# Altium PCB BOARD_4LAYER.PcbDoc (part 15 of 21)
Units mil, origin at the board's own origin, x right, y up, seen from the top; angles counter-clockwise.
Board outline 6692.91 x 10039.37 mil, 4 copper layers (Top Layer, Mid Layer 1, Mid Layer 2, Bottom Layer), stack 66.299 mil thick; 1532 components, 908 nets, 4105 pads, 1286 vias.
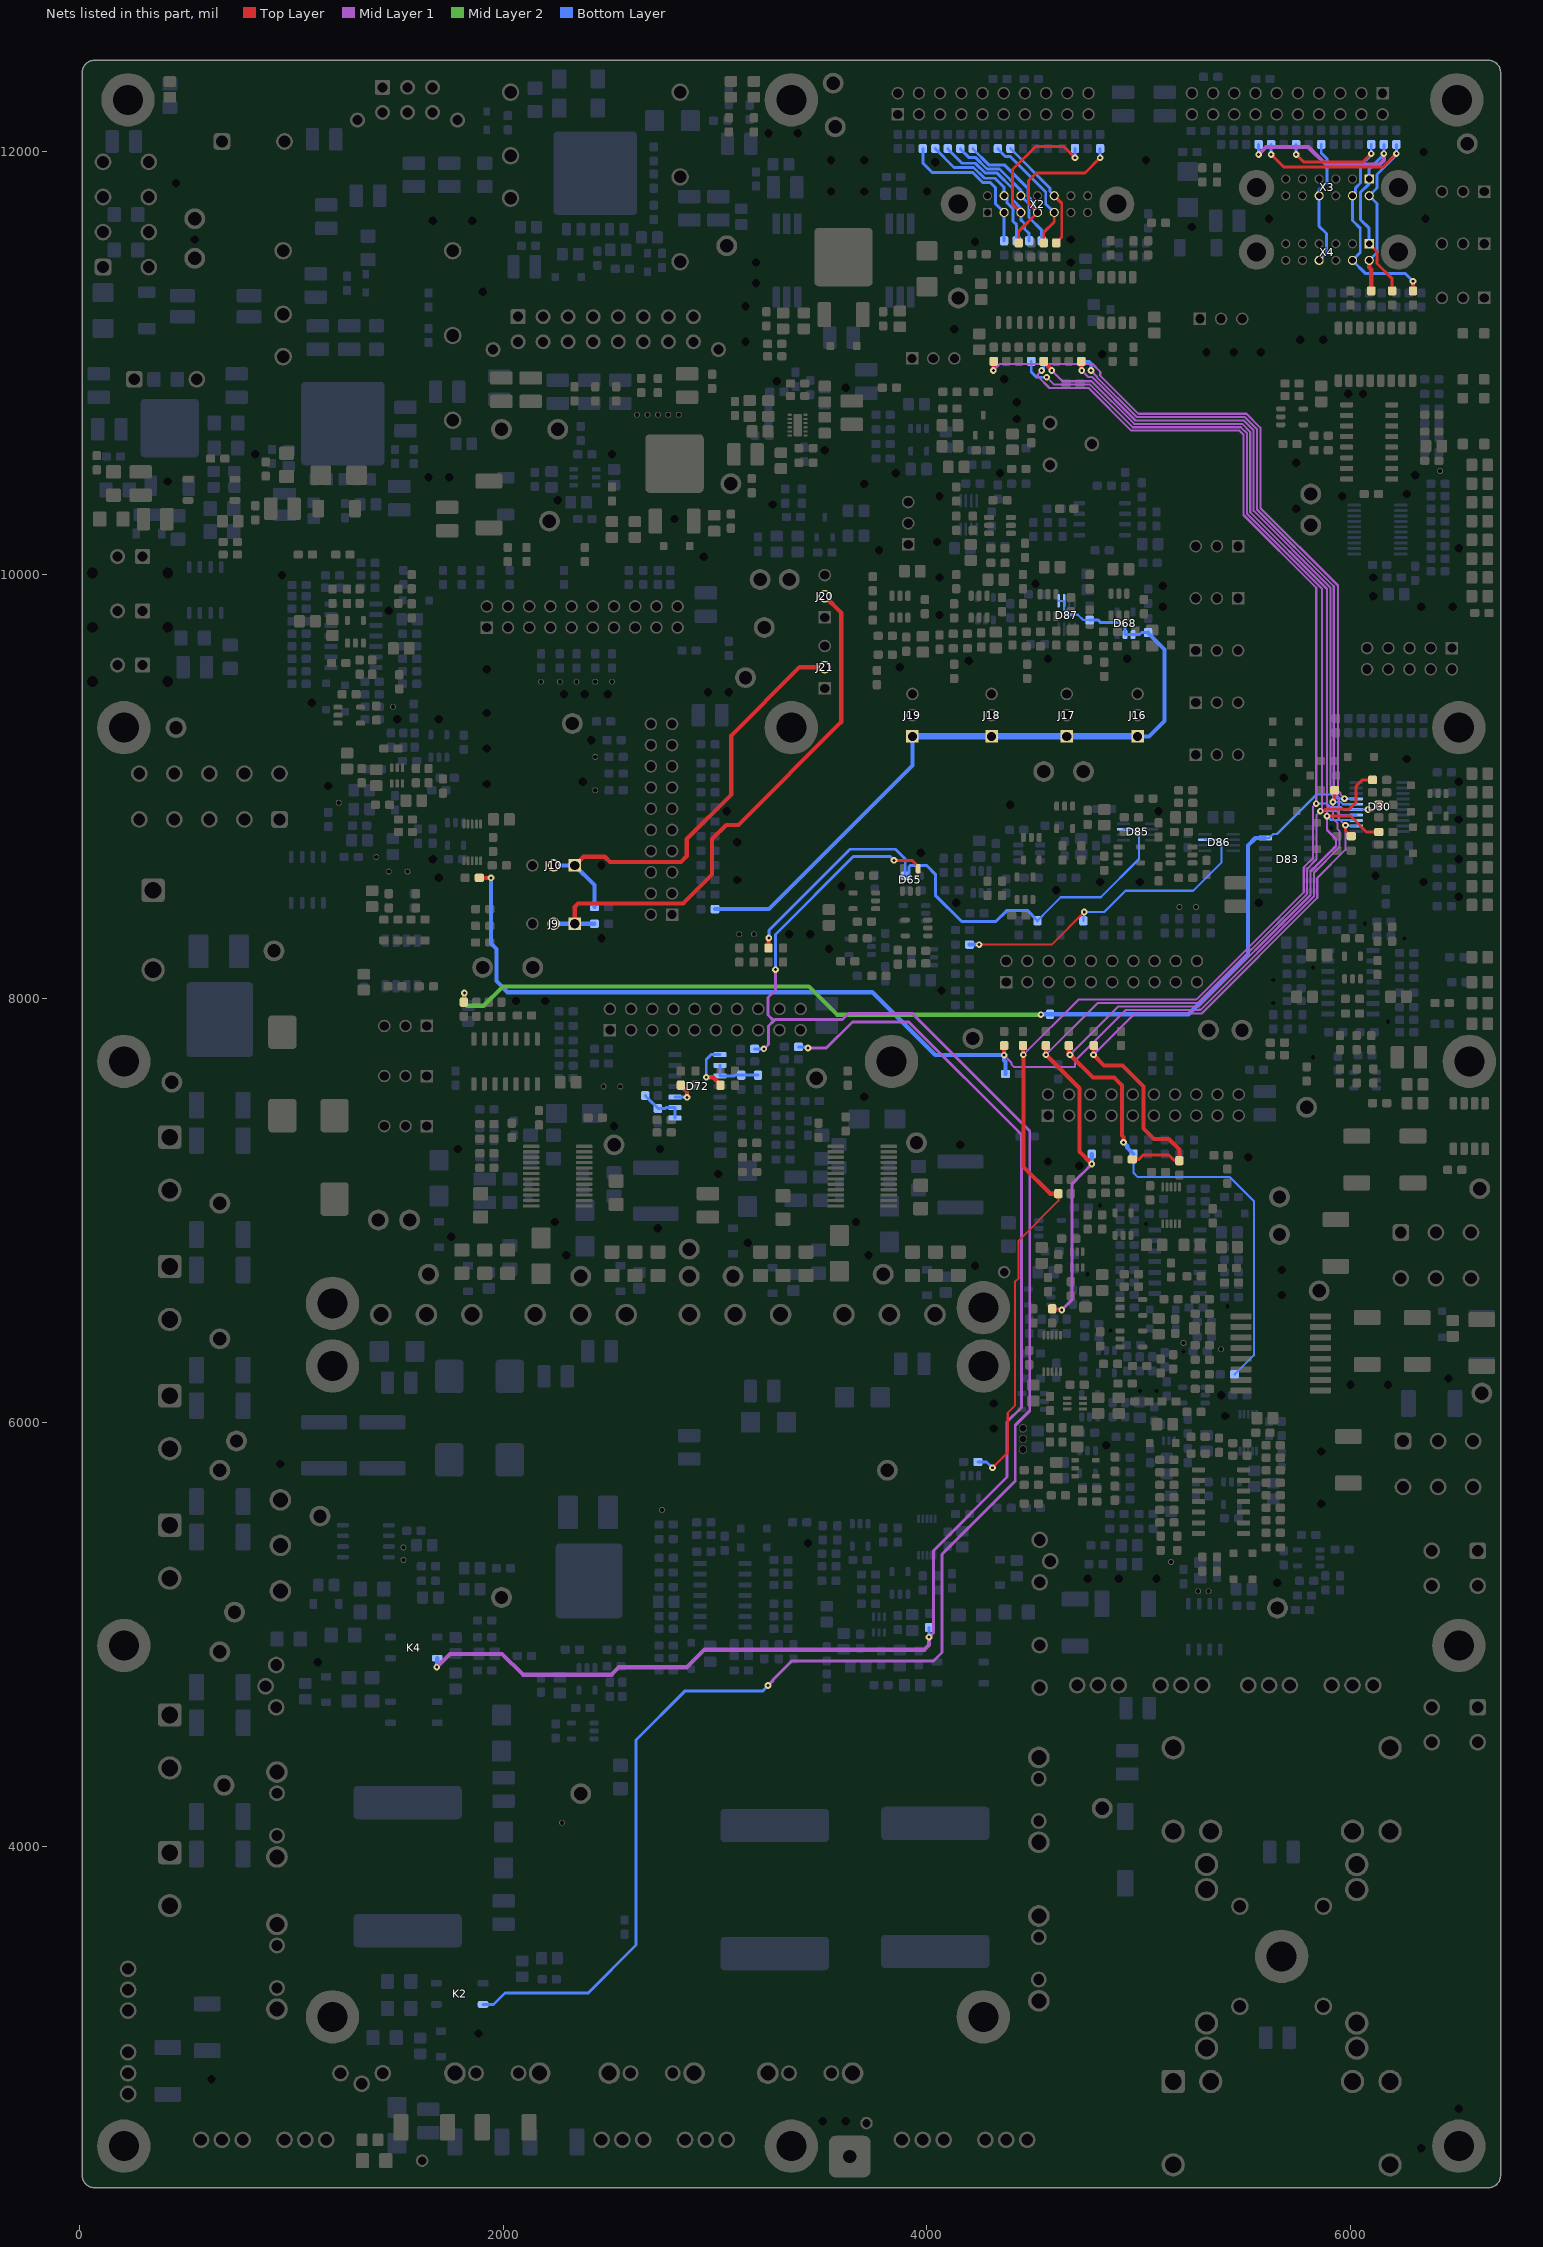
[diagram p17: the nets of this part, all layers, seen from the top]

## Via types
v1: diameter 27.56/31.5/31.5/27.56 (per signal layer), hole 13.78, Top Layer to Bottom Layer, 1270 vias
v2: diameter 59.06, hole 39.37, Top Layer to Bottom Layer, 16 vias

## Nets (pads, with @x,y where several pads share a name; then routed paths per layer and width w, separated by ;. In a path a pad name is that pad's centre, name@x,y a point inside that pad or via, vN(x,y) a via of type N, cw(c..) or ccw(c..) an arc to the next point about the centre after c; other vN are vias at no path point) (continued)
A0_PS: R26.1 R434.1 R611.1 X3.8 X4.8 | length 1417.8
  Top Layer w13.78: v1(5742.13,11984.25) 5776.84,11949.54 6057.81,11949.54 v1(6096.46,11988.19)
  Top Layer w19.68: R611.1@6293.31,11340.55 v1(6293.31,11385.83)
  Bottom Layer w13.78: v1(5742.13,11984.25) R26.1@5742.13,12031.5 ; R434.1@6096.46,12031.5 v1(6096.46,11988.19) 6096.46,11982.37 6045.91,11931.82 6045.91,11849.9 6022.76,11826.75 6022.76,11804.25 X3.8@6007.87,11789.37 6007.87,11672.59 6044.57,11635.9 6044.57,11520.94 X4.8@6007.87,11484.25 6070.54,11421.59 6257.54,11421.59 v1(6293.31,11385.83)
A1_PS: R27.2 R430.1 R612.1 X3.1 X4.1 | length 1524.6
  Top Layer w13.78: X4.1@6086.61,11562.99 6122.95,11526.65 6122.95,11469.78 6194.88,11397.85 R612.1@6194.88,11340.55
  Mid Layer 1 w19.68: v1(5564.96,11984.25) 5600.1,12019.39 5798.92,12019.39 5882.05,11936.26 6135.08,11936.26 6155.51,11956.69 v1(6155.51,11988.19)
  Bottom Layer w13.78: v1(5564.96,11984.25) R27.2@5564.96,12031.5 ; X4.1@6086.61,11562.99 6086.61,11635.76 6046.08,11676.29 6046.08,11805.69 6086.61,11846.22 X3.1@6086.61,11868.11 6086.61,11915.35 6155.51,11984.25 v1(6155.51,11988.19) R430.1@6155.51,12031.5
A2_PS: R28.1 R435.1 R613.1 X3.7 X4.7 | length 1467.2
  Top Layer w13.78: v1(5624.02,11984.25) 5683.36,11924.9 6151.28,11924.9 v1(6214.57,11988.19)
  Top Layer w19.68: X4.7@6086.61,11484.25 6086.61,11451.69 6096.46,11441.85 R613.1@6096.46,11340.55
  Bottom Layer w13.78: v1(5624.02,11984.25) R28.1@5624.02,12031.5 ; X4.7@6086.61,11484.25 6123.5,11521.14 6123.5,11752.48 X3.7@6086.61,11789.37 6122.95,11825.71 6122.95,11889.82 6214.57,11981.44 v1(6214.57,11988.19) R435.1@6214.57,12031.5
BLOCING: D30.7 D83.6 R12.2 R44.2 R500.1 | length 8504.7
  Top Layer w10: R44.2@1814.96,7984.25 1814.96,8025.59 v1(1816.93,8027.56)
  Top Layer w19.68: v1(4312.99,10964.57) 4314.96,10966.54 R12.2@4314.96,11007.87
  Mid Layer 1 w10: v1(4312.99,10964.57) 4343.58,10995.16 4780.73,10995.16 4817.52,10958.36 4817.52,10940.35 4997.32,10760.55 5507.45,10760.55 5573.32,10694.68 5573.32,10315.85 5939.08,9950.09 5939.08,8981.89 5951.63,8969.34 5951.63,8963.73 v1(5970.47,8944.88)
  Mid Layer 2 w19.68: v1(1816.93,8027.56) 1816.93,7981.63 1830.85,7967.71 1908.91,7967.71 1999.52,8058.32 3442.52,8058.32 3575.64,7925.2 v1(4537.4,7925.2)
  Bottom Layer w10: D83.6@5596.46,8759.45 5615.16,8759.45 5633.53,8777.82 5651.41,8777.82 5837.86,8964.27 5917.47,8964.27 5936.7,8945.04 5970.31,8945.04 v1(5970.47,8944.88) 5971.46,8943.9 D30.7@6025.59,8943.9
  Bottom Layer w19.68: v1(4537.4,7925.2) 4539.37,7927.17 R500.1@4580.71,7927.17 5234.26,7927.17 5514.79,8207.7 5514.79,8723.74 5548.92,8757.87 5550.2,8757.87 5551.78,8759.45 D83.6@5596.46,8759.45
BLOCING_AMP: D30.3 R14.2 R63.1 R101.1 R482.1 R494.1 | length 7654.6
  Top Layer w13.78: v1(5887.8,8862.2) 5998.13,8862.2 6072.93,8787.4 R101.1@6131.89,8787.4
  Top Layer w19.68: R14.2@4551.18,11007.87 4551.18,11005.91 4588.58,10968.5 v1(4588.58,10964.57) ; R494.1@4669.29,7779.53 4669.29,7742.13 v1(4675.2,7736.22) 4782.89,7628.53 4883.31,7628.53 4919.91,7591.93 4919.91,7354.78 4927.17,7347.52 v1(4927.17,7322.83)
  Mid Layer 1 w10: v1(4588.58,10964.57) 4639.24,10913.91 4776.48,10913.91 4977.56,10712.83 5487.68,10712.83 5525.6,10674.91 5525.6,10296.09 5887.8,9933.89 5887.8,8914.52 5891.05,8911.26 5891.05,8898.09 5887.8,8894.83 v1(5887.8,8862.2) 5887.8,8796.52 5930.2,8754.12 5930.2,8721.24 5809.65,8600.69 5809.65,8489.71 5284.38,7964.44 4903.41,7964.44 v1(4675.2,7736.22)
  Bottom Layer w10: R482.1@4974.41,7267.72 4974.41,7179.63 4995.14,7158.9 5429.77,7158.9 5542.4,7046.27 5542.4,6317.99 5452.76,6228.35 R63.1@5450.79,6228.35 ; v1(5887.8,8862.2) 5906.42,8843.58 6023.54,8843.58 D30.3@6025.59,8841.54
  Bottom Layer w19.68: v1(4927.17,7322.83) 4945.09,7304.91 4945.09,7299 4945.9,7298.2 4945.9,7296.23 R482.1@4974.41,7267.72
BLOCING_AMP_UM: R20.1 R444.1 X2.5 | length 588.9
  Top Layer w13.78: R20.1@4551.18,11566.93 4551.18,11616.69 4600.39,11665.9 X2.5@4600.39,11710.63
  Bottom Layer w13.78: R444.1@4334.65,12011.81 4334.65,12009.84 4369.74,11974.75 4392.96,11974.75 4560.31,11807.4 4560.31,11750.72 X2.5@4600.39,11710.63
BLOCING_IP: D30.6 R15.2 R56.1 R102.1 R478.1 R505.1 | length 8631.2
  Top Layer w13.78: v1(5915.35,8929.13) 5923.23,8937.01 R102.1@5923.23,8984.25
  Top Layer w19.68: R56.1@1887.8,8570.87 v1(1942.91,8570.87) ; v1(4364.17,7734.25) R505.1@4364.17,7779.53 ; R15.2@4728.35,11007.87 4728.35,10966.54 v1(4730.31,10964.57)
  Mid Layer 1 w10: v1(4364.17,7734.25) 4398.46,7699.97 4398.46,7692.09 4412.6,7677.94 4698.58,7677.94 4698.58,7707.76 4937.83,7947.01 5282.74,7947.01 5284.26,7948.53 5290.96,7948.53 5825.55,8483.12 5825.55,8594.1 5946.1,8714.65 5946.1,8792.44 5937.93,8800.61 5937.93,8827.82 5915.35,8850.39 v1(5915.35,8929.13) 5915.35,8960.63 5903.7,8972.28 5903.7,9940.48 5541.5,10302.68 5541.5,10681.5 5494.27,10728.73 4984.15,10728.73 4779.02,10933.86 4761.02,10933.86 v1(4730.31,10964.57)
  Bottom Layer w10: v1(5915.35,8929.13) 5951.31,8929.13 5962.14,8918.31 D30.6@6025.59,8918.31
  Bottom Layer w19.68: v1(1942.91,8570.87) 1942.91,8261.42 1968.71,8235.63 1968.71,8083.93 2021.51,8031.13 3742.08,8031.13 4038.96,7734.25 v1(4364.17,7734.25) 4364.17,7709.57 4370.08,7703.66 R478.1@4370.08,7645.67
BLOCING_IP_UM: R21.1 R440.1 X2.12 | length 555.8
  Top Layer w13.78: X2.12@4600.39,11789.37 4635.91,11753.85 4635.91,11594.57 4635.33,11593.99 4635.33,11592.02 R21.1@4610.24,11566.93
  Bottom Layer w13.78: R440.1@4393.7,12011.81 4580.55,11824.97 4580.55,11809.22 X2.12@4600.39,11789.37
BLOCING_IS: D30.2 R16.2 R83.1 R103.1 R481.1 R506.1 | length 5948.5
  Top Layer w13.78: R481.1@4968.5,7242.13 4999.17,7242.13 5020.32,7263.28 5141,7263.28 5168.06,7236.22 R83.1@5190.94,7236.22 ; v1(5974.41,8818.9) 5974.41,8793.31 6000,8767.72 R103.1@6001.97,8767.72
  Top Layer w19.68: R506.1@4787.4,7779.53 4787.4,7738.19 v1(4785.43,7736.22) 4836.05,7685.6 4923.16,7685.6 5021.74,7587.02 5021.74,7388.64 5071.8,7338.58 5140.73,7338.58 5190.94,7288.37 R83.1@5190.94,7236.22
  Mid Layer 1 w10: v1(4773.62,10964.57) 4801.61,10936.57 4801.61,10933.76 4990.74,10744.64 5500.86,10744.64 5557.41,10688.09 5557.41,10309.27 5919.61,9947.07 5919.61,8978.87 5935.72,8962.75 5935.72,8957.14 5942.91,8949.95 5942.91,8850.39 v1(5974.41,8818.9) 5974.41,8703.05 5841.46,8570.1 5841.46,8476.53 5296.03,7931.11 4980.32,7931.11 v1(4785.43,7736.22)
  Bottom Layer w10: v1(5974.41,8818.9) 5977.36,8815.94 D30.2@6025.59,8815.94
  Bottom Layer w13.78: R16.2@4728.35,11007.87 4766.55,11007.87 4773.62,11000.8 v1(4773.62,10964.57)
BLOCING_IS_UM: R22.1 R445.1 X2.10 | length 647.2
  Bottom Layer w13.78: R445.1@4157.48,12011.81 4157.48,12009.84 4196.78,11970.55 4227.99,11970.55 4282.84,11915.7 4342.31,11915.7 4442.91,11815.1 X2.10@4442.91,11789.37 4481.63,11750.65 4481.63,11686.68 4541.34,11626.97 R22.1@4541.34,11576.77
BLOCING_PS: R433.1 X3.10 X4.10 | length 602.6
  Bottom Layer w13.78: X4.10@5850.39,11484.25 5885.09,11518.95 5885.09,11610.98 5850.39,11645.67 X3.10@5850.39,11789.37 5850.39,11817.21 5887.45,11854.27 5887.45,11963.91 5860.24,11991.13 R433.1@5860.24,12031.5
BLOCING_T: D30.4 R18.2 R100.1 R105.1 R480.1 R495.1 | length 7104.3
  Top Layer w13.78: R100.1@4590.55,6537.4 4629.92,6537.4 v1(4635.83,6531.5) ; v1(5856.3,8885.83) 5872.15,8885.83 5880.98,8894.66 5992.23,8894.66 6024.58,8927.01 6024.58,9002.97 6055.08,9033.46 R105.1@6102.36,9033.46
  Top Layer w19.68: R495.1@4561.02,7779.53 v1(4561.02,7736.22) 4719.17,7578.07 4719.17,7278.86 v1(4777.56,7220.47)
  Mid Layer 1 w10: v1(4561.02,7736.22) 4805.15,7980.34 5277.79,7980.34 5793.74,8496.3 5793.74,8613.67 5837.45,8657.38 5837.45,8866.98 v1(5856.3,8885.83) 5863.27,8892.8 5863.27,9935.93 5509.69,10289.5 5509.69,10668.32 5481.09,10696.92 4970.97,10696.92 4769.89,10898 4600.03,10898 v1(4564.96,10933.07)
  Mid Layer 1 w13.78: v1(4635.83,6531.5) 4685.09,6580.76 4685.09,7128 4733.11,7176.02 4733.65,7176.02 4757.38,7199.75 4757.38,7200.29 v1(4777.56,7220.47)
  Bottom Layer w10: v1(5856.3,8885.83) 5873.92,8885.83 5875.66,8887.56 5930.42,8887.56 5950.86,8867.13 D30.4@6025.59,8867.13
  Bottom Layer w13.78: R18.2@4492.13,11007.87 4492.13,10957.85 4516.9,10933.07 v1(4564.96,10933.07)
  Bottom Layer w19.68: v1(4777.56,7220.47) R480.1@4777.56,7267.72
BLOCING_T_UM: R24.1 R446.1 X2.9 | length 676.8
  Bottom Layer w13.78: R446.1@4039.37,12011.81 4128.06,11923.12 4219.74,11923.12 4271.08,11871.78 4320.71,11871.78 4364.17,11828.31 X2.9@4364.17,11789.37 4378.41,11775.14 4378.41,11755.26 4404.93,11728.74 4404.93,11670.6 4423.23,11652.3 R24.1@4423.23,11576.77
BLOCING_U_MOST: K4.2 R97.1 R461.1 | length 6450.8
  Mid Layer 1 w13.78: v1(3438.98,7767.72) 3524.68,7767.72 3648.23,7891.26 3914.06,7891.26 4445.45,7359.87 4445.45,6072.31 4377.23,6004.09 4377.23,5743.39 4031.53,5397.69 4031.53,5009.88 v1(4009.84,4988.19)
  Mid Layer 1 w19.68: v1(1687.01,4846.46) 1749.71,4909.16 1995.32,4909.16 2093.46,4811.03 2512.3,4811.03 2547.76,4846.49 2866.69,4846.49 2867.32,4846.49 2949.85,4929.03 3987.79,4929.03 4009.84,4951.09 v1(4009.84,4988.19)
  Bottom Layer w13.78: R461.1@3393.7,7773.62 3433.07,7773.62 v1(3438.98,7767.72) ; v1(4009.84,4988.19) R97.1@4009.84,5033.46
  Bottom Layer w19.68: v1(1687.01,4846.46) 1687.15,4846.59 1687.15,4860.49 1688.98,4862.32 K4.2@1688.98,4888.98
BLOCING_UM: R8.1 R439.1 R619.2 X2.4 | length 1243.7
  Top Layer w13.78: R8.1@4433.07,11566.93 4433.07,11622.05 X2.4@4521.65,11710.63 4479.88,11752.41 4479.88,11860.63 4515.79,11896.54 4744.96,11896.54 v1(4816.93,11968.5)
  Bottom Layer w13.78: R439.1@4216.54,12011.81 4216.54,12009.84 4291,11935.38 4365.02,11935.38 4477.61,11822.79 4477.61,11784.63 4505.38,11756.85 4505.38,11726.9 X2.4@4521.65,11710.63 ; v1(4816.93,11968.5) R619.2@4816.93,12011.81
BLOCING_Z: D30.5 R17.2 R92.1 R104.1 R479.1 R499.1 | length 7745.9
  Top Layer w10: v1(4309.06,5787.4) 4381.06,5859.41 4381.06,6046.68 4414.8,6080.41 4414.8,6664.53 4432.27,6682 4432.27,6858.93 4620.08,7046.73 R479.1@4620.08,7080.71
  Top Layer w13.78: v1(6080.71,8893.7) 6084.15,8890.26 6104.83,8890.26 6129.92,8915.35 R104.1@6131.89,8915.35
  Top Layer w19.68: R499.1@4452.76,7779.53 4452.76,7746.97 4453.64,7746.08 4453.64,7737.3 v1(4454.72,7736.22) 4454.72,7207.5 4581.52,7080.71 R479.1@4620.08,7080.71
  Mid Layer 1 w10: v1(4454.72,7736.22) 4714.75,7996.25 5271.2,7996.25 5777.83,8502.88 5777.83,8620.25 5821.29,8663.71 5821.29,8905.93 v1(5836.61,8921.26) 5836.61,9940.09 5493.79,10282.91 5493.79,10661.74 5474.51,10681.02 4964.38,10681.02 4763.3,10882.1 4578.24,10882.1 4522.49,10937.85 4522.49,10945.72 v1(4541.34,10964.57)
  Bottom Layer w10: v1(5836.61,8921.26) 5888.32,8921.26 5905.29,8904.29 5953.66,8904.29 5965.23,8892.72 D30.5@6025.59,8892.72 6079.72,8892.72 v1(6080.71,8893.7)
  Bottom Layer w13.78: R92.1@4240.16,5814.96 4281.5,5814.96 v1(4309.06,5787.4) ; v1(4541.34,10964.57) 4551.18,10974.41 R17.2@4551.18,11007.87
BLOCING_Z_UM: R23.1 R441.1 R620.2 X2.3 | length 1288.1
  Top Layer w13.78: X2.3@4442.91,11710.63 4403.89,11749.65 4403.89,11912.8 4513.34,12022.25 4645.07,12022.25 v1(4698.82,11968.5)
  Bottom Layer w13.78: R441.1@4098.43,12011.81 4098.43,12009.84 4165.46,11942.81 4227.89,11942.81 4274.69,11896.01 4289.14,11896.01 4289.27,11895.89 4331.72,11895.89 4403.52,11824.09 4403.52,11771.3 4442.91,11731.9 X2.3@4442.91,11710.63 4442.91,11676.18 4460.65,11658.44 4460.65,11632.85 4482.28,11611.22 R23.1@4482.28,11576.77 ; v1(4698.82,11968.5) R620.2@4698.82,12011.81
CHARGE_CAP: D65.4 K2.2 R454.1 | length 8989.1
  Top Layer w13.78: v1(3844.49,8653.54) 3929.13,8653.54 3958.66,8624.02 D65.4@3958.66,8614.17
  Mid Layer 1 w13.78: v1(3230.32,7763.78) 3251.72,7785.18 3251.72,7871.32 3277.52,7897.12 ; v1(3250,4759.84) 3272.72,4782.56 3272.72,4786.5 3362.35,4876.13 4031.1,4876.13 4070.9,4915.92 4070.9,5379.04 4416.6,5724.74 4416.6,5987.78 4484.82,6056 4484.82,7376.18 3930.36,7930.63 3629.5,7930.63 3601.57,7902.7 3283.11,7902.7 3277.52,7897.12 ; v1(3285.43,8137.8) 3285.43,8105.16 3285.43,8099.17 3285.43,8041.19 3250.36,8006.11 3250.36,7924.28 3277.52,7897.12
  Bottom Layer w13.78: K2.2@1905.51,3255.12 1954.2,3255.12 2008.54,3309.45 2401.67,3309.45 2627.28,3535.06 2627.28,4503.56 2856.95,4733.24 3187.84,4733.24 3223.39,4733.24 v1(3250,4759.84) ; R454.1@3187.01,7763.78 v1(3230.32,7763.78) ; v1(3285.43,8137.8) 3285.43,8304.16 3652.39,8671.12 3826.91,8671.12 v1(3844.49,8653.54)
DELAY_WRITE: D86.7 R111.1 R498.1 | length 1569.7
  Top Layer w10: v1(4246.06,8255.91) 4588.58,8255.91 v1(4742.13,8409.45)
  Bottom Layer w10: R498.1@4738.19,8368.11 4738.19,8400.67 v1@4746.97,8409.45 ; v1(4742.13,8409.45) v1@4746.97,8409.45 ; D86.7@5311.02,8750.98 5370.65,8750.98 5390.05,8731.58 5390.05,8643.9 5255.94,8509.79 4936.63,8509.79 4836.29,8409.45 v1@4746.97,8409.45
  Bottom Layer w19.68: R111.1@4200.79,8255.91 v1(4246.06,8255.91)
DELAY_WRITE_UM: R25.1 R448.1 X2.2 | length 727.1
  Bottom Layer w13.78: R448.1@3980.32,12011.81 3980.32,11943.25 4024.44,11899.13 4215.89,11899.13 4262.93,11852.09 4298.61,11852.09 4323.58,11827.13 4323.58,11751.22 X2.2@4364.17,11710.63 R25.1@4364.17,11576.77
DISCHARGE_CAP: D85.7 R45.1 R108.1 R497.1 | length 2663.4
  Top Layer w19.68: R45.1@3251.97,8240.16 3251.97,8285.43 v1(3253.94,8287.4)
  Bottom Layer w10: R497.1@4521.65,8368.11 4546.74,8393.2 4546.74,8395.17 4631.08,8479.5 4820.63,8479.5 5000.72,8659.59 5000.72,8772.56 4973.09,8800.2 D85.7@4927.17,8800.2
  Bottom Layer w13.78: v1(3253.94,8287.4) 3253.94,8323.23 3636.69,8705.98 3852.07,8705.98 3897.64,8660.41 R108.1@3897.64,8580.71 3915.74,8580.71 3915.74,8622.98 3922.81,8630.05 3997.37,8630.05 4039.37,8588.05 4039.37,8489.21 4164.33,8364.26 4324.65,8364.26 4376.52,8416.13 4475.6,8416.13 4496.56,8395.17 4496.56,8393.2 R497.1@4521.65,8368.11
FAULT/SD: D72.1 D72.2 R53.1 R252.1 | length 219.1
  Bottom Layer w13.78: R252.1@2671.26,7543.31 2671.26,7541.34 2703.26,7509.34 2705.22,7509.34 2730.32,7484.25 R53.1@2730.32,7482.28 2765.28,7482.28 2769.61,7486.61 D72.2@2811.02,7486.61 D72.1@2811.02,7436.61
FAULT/SD_OSC: D72.3 R453.1 | length 126.9
  Top Layer w10: R453.1@2838.58,7590.55 R453.1@2838.58,7592.52
  Top Layer w19.68: R453.1@2838.58,7590.55 2868.11,7561.02 v1(2868.11,7535.43)
  Bottom Layer w13.78: D72.3@2811.02,7536.61 2866.93,7536.61 v1(2868.11,7535.43)
FLT_CLR: D72.9 D72.10 R52.1 R254.1 | length 230.4
  Bottom Layer w13.78: D72.9@3023.62,7686.61 D72.10@3023.62,7636.61 3090.28,7636.61 3093.43,7639.76 R254.1@3124.02,7639.76 R52.1@3202.76,7639.76
FLT_CLR_OSC: D72.8 R458.1 | length 241.9
  Top Layer w19.68: v1(2958.66,7629.92) 2990.16,7629.92 3025.59,7594.49 R458.1@3025.59,7592.52
  Bottom Layer w13.78: v1(2958.66,7629.92) 2958.66,7713.93 2981.34,7736.61 D72.8@3023.62,7736.61
GEN_EN: J10.1 J10.2 J21.2 R513.1 | length 2132
  Top Layer w19.68: J10.1@2338.19,8629.92 2378.85,8670.58 2479.8,8670.58 2503.97,8646.41 2838.91,8646.41 2866.75,8674.25 2866.75,8753.36 3076.8,8963.41 3076.8,9242.42 3399.33,9564.96 J21.2@3517.72,9564.96
  Bottom Layer w19.68: J10.2@2238.19,8629.92 J10.1@2338.19,8629.92 2431.1,8537.01 R513.1@2431.1,8433.07
GEN_F: J9.1 J9.2 J20.2 R509.1 | length 2615
  Top Layer w19.68: J9.1@2338.19,8354.33 2338.19,8433.73 2354.16,8449.7 2849.74,8449.7 2986.31,8586.27 2986.31,8753.97 3053.05,8820.71 3110.55,8820.71 3595.23,9305.39 3595.23,9822.09 J20.2@3517.72,9899.61
  Bottom Layer w19.68: J9.2@2238.19,8354.33 J9.1@2338.19,8354.33 R509.1@2431.1,8354.33
GEN_SUM: D68.1 D68.2 D87.5 D87.6 J16.1 J17.1 J18.1 J19.1 R514.1 R751.1 R752.1 | length 3557
  Bottom Layer w10: D87.5@4621.06,9877.95 D87.6@4646.65,9877.95 4646.65,9835.55 4669.66,9812.54 4711.99,9812.54 4737.13,9787.4 R751.1@4767.72,9787.4
  Bottom Layer w13.78: R751.1@4767.72,9787.4 4807.72,9787.4 4820.08,9775.04 4913.53,9775.04 4935.04,9753.53 D68.2@4935.04,9718.5 D68.1@4972.44,9718.5 5002.87,9718.5 5012.72,9728.35 R752.1@5043.31,9728.35
  Bottom Layer w19.68: R514.1@3000,8423.23 3253.91,8423.23 3931.1,9100.42 J19.1@3931.1,9238.58 ; J16.1@4994.09,9238.58 5048.21,9238.58 5121.39,9311.76 5121.39,9648.3 5043.31,9726.38 R752.1@5043.31,9728.35
  Bottom Layer w29.53: J19.1@3931.1,9238.58 J18.1@4305.12,9238.58 J17.1@4659.45,9238.58 J16.1@4994.09,9238.58